# Altium PCB RADAR_D79_POWER_24V_v0.9.3.37_R10_3_37_REZONIT_IMPEDANCE_RECALC_NATIVE.PcbDoc (part 9 of 9)
Units mil, origin at the board's own origin, x right, y up, seen from the top; angles counter-clockwise.
Board outline 3110.24 x 3110.24 mil, 10 copper layers (Top Layer, RF_GND, SIG_A0, SIG_A1, PWR_A, PWR_B, SIG_B1, SIG_B0, DIGITAL_GND, Bottom Layer), stack 80.001 mil thick; 304 components, 269 nets, 1408 pads, 1372 vias.
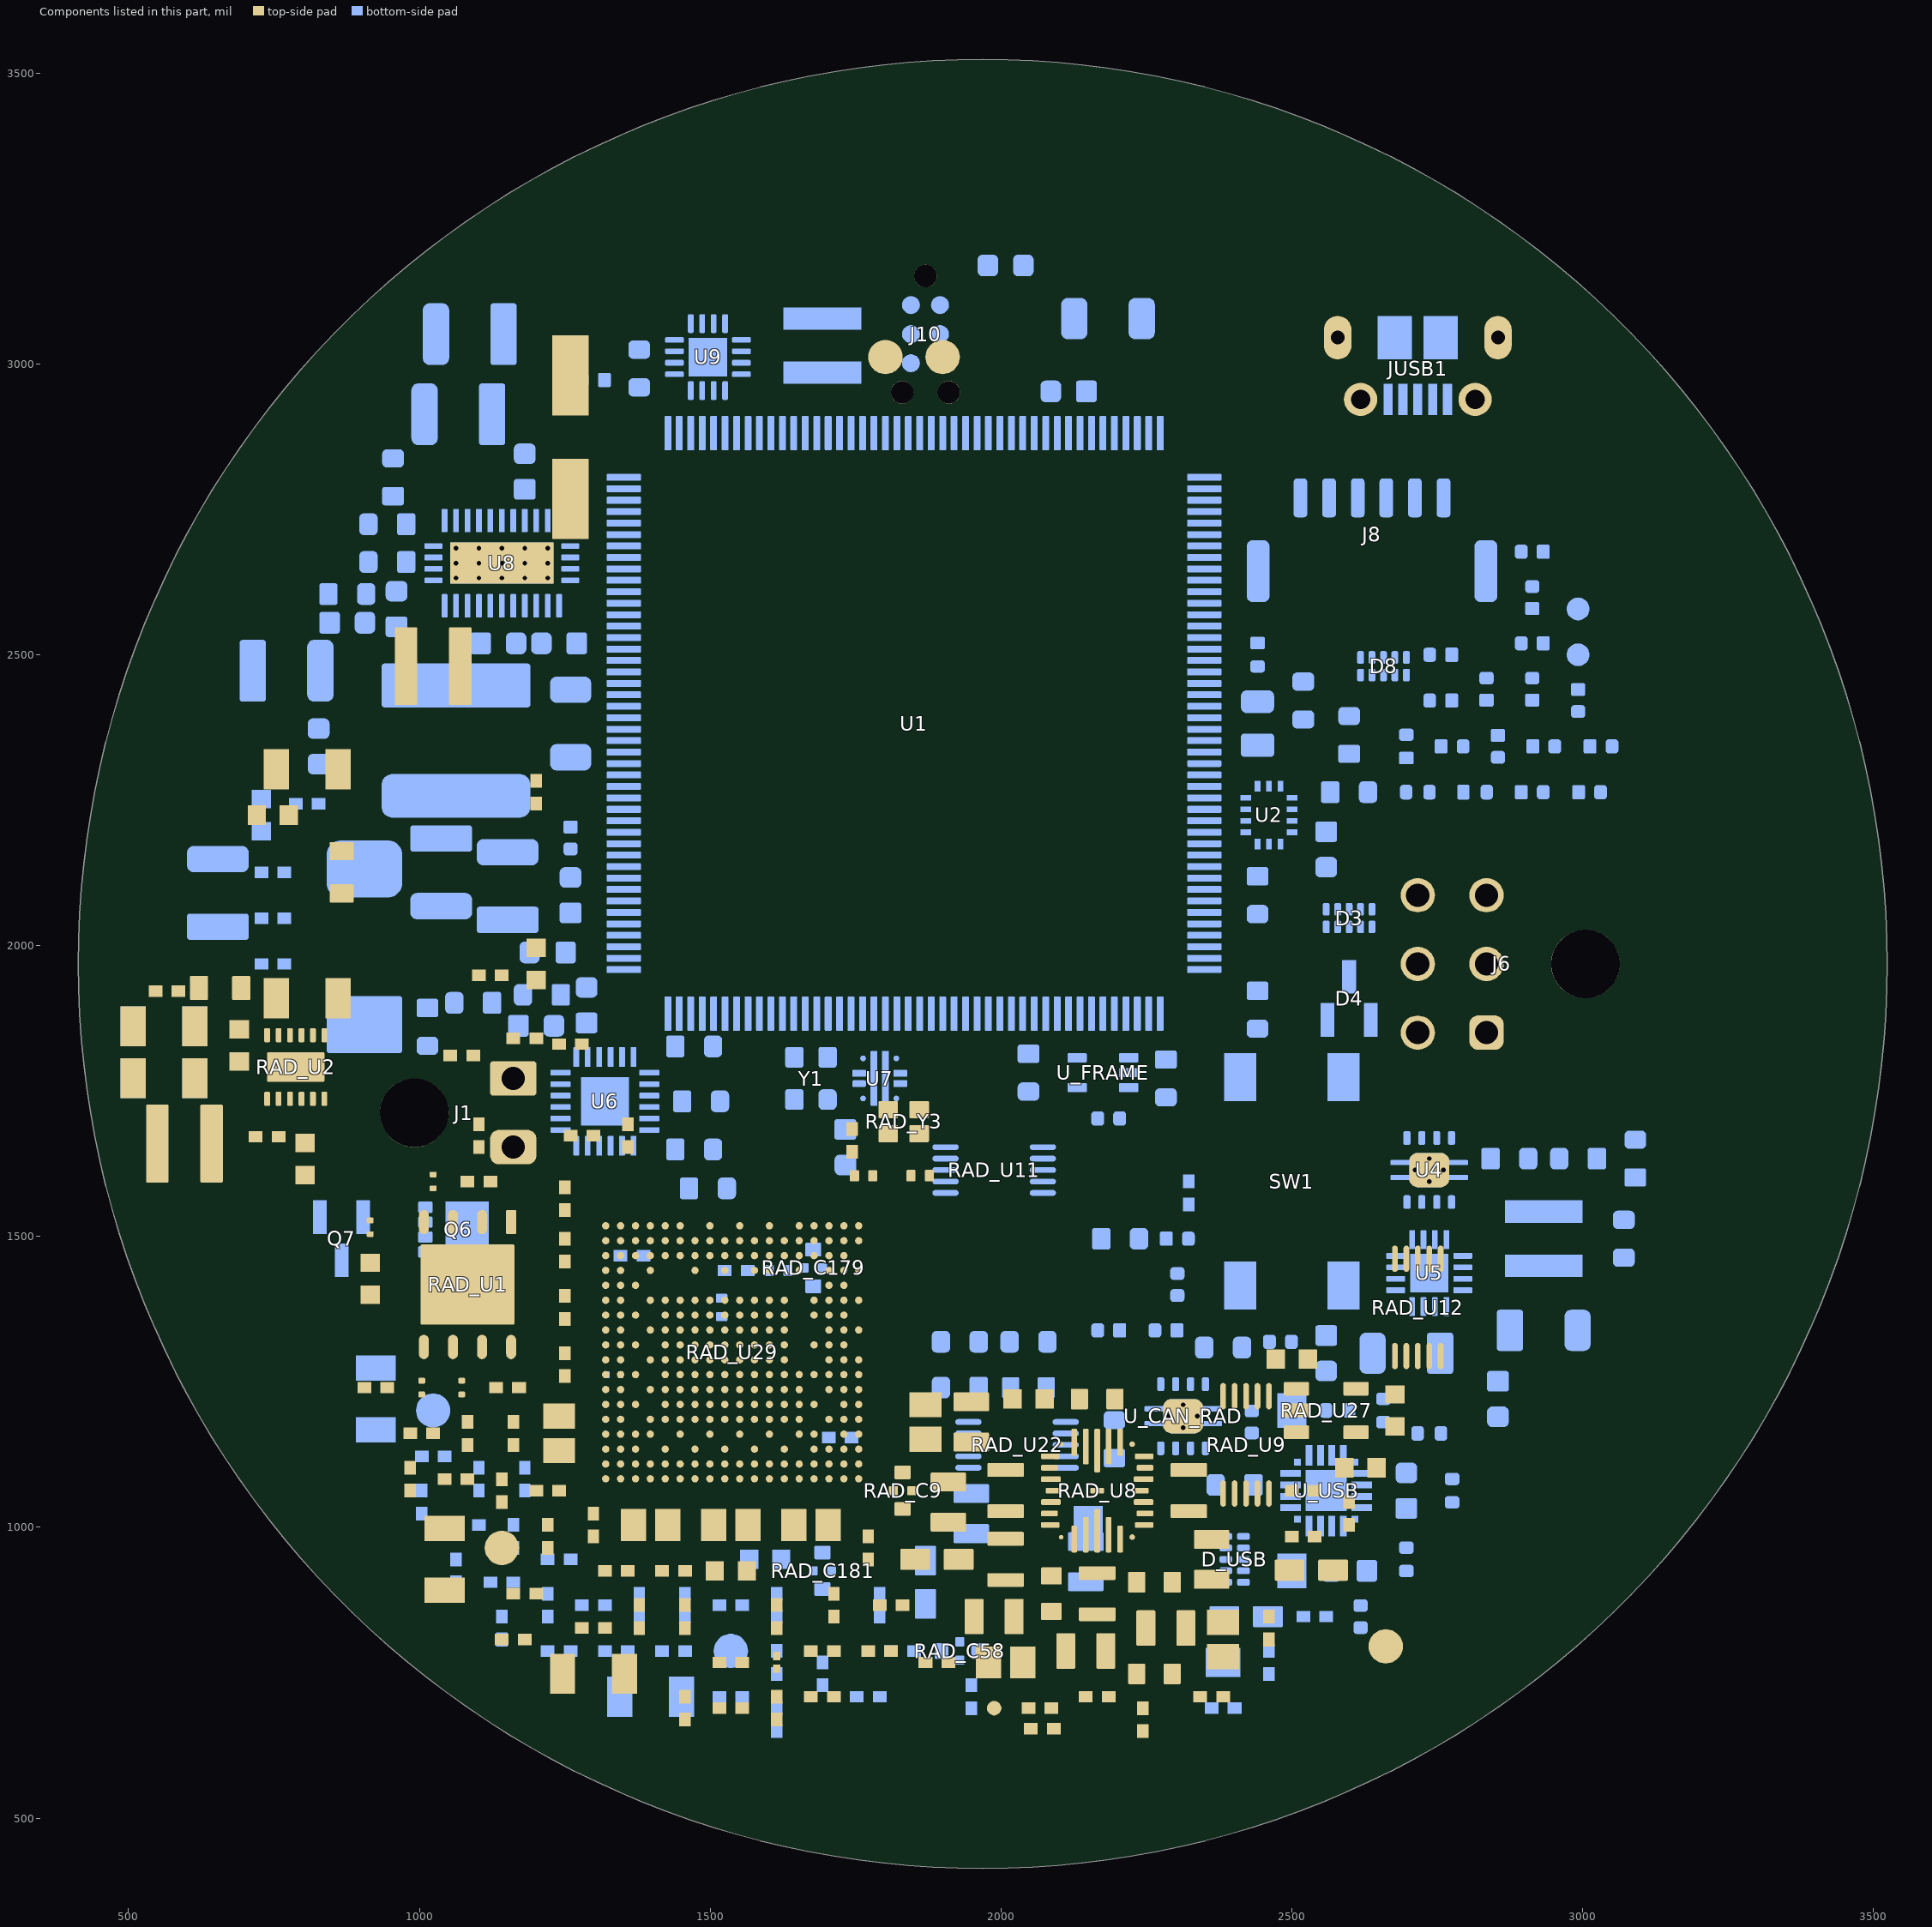
[diagram p17: the components of this part, seen from the top]

## Other copper
Top Layer:
  rectangle net TI_RX1: 1411.84,1961.62 1464.99,2004.14
  rectangle net TI_RX1: 1417.74,2021.76 1459.08,2064.28
  rectangle net TI_RX1: 1422.27,2081.9 1454.56,2124.42
  rectangle net TI_RX1: 1425.62,2142.04 1451.21,2184.56
  rectangle net TI_RX1: 1425.62,2202.18 1451.21,2244.7
  rectangle net TI_RX1: 1422.27,2262.33 1454.56,2304.85
  rectangle net TI_RX1: 1417.74,2322.47 1459.08,2364.99
  rectangle net TI_RX1: 1411.84,2382.61 1464.99,2425.13
  rectangle net TI_RX2: 1486.64,1961.62 1539.79,2004.14
  rectangle net TI_RX2: 1492.55,2021.76 1533.89,2064.28
  rectangle net TI_RX2: 1497.08,2081.9 1529.36,2124.42
  rectangle net TI_RX2: 1500.42,2142.04 1526.01,2184.56
  rectangle net TI_RX2: 1500.42,2202.18 1526.01,2244.7
  rectangle net TI_RX2: 1497.08,2262.33 1529.36,2304.85
  rectangle net TI_RX2: 1492.55,2322.47 1533.89,2364.99
  rectangle net TI_RX2: 1486.64,2382.61 1539.79,2425.13
  rectangle net TI_RX3: 1561.45,1961.62 1614.59,2004.14
  rectangle net TI_RX3: 1567.35,2021.76 1608.69,2064.28
  rectangle net TI_RX3: 1571.88,2081.9 1604.16,2124.42
  rectangle net TI_RX3: 1575.22,2142.04 1600.82,2184.56
  rectangle net TI_RX3: 1575.22,2202.18 1600.82,2244.7
  rectangle net TI_RX3: 1571.88,2262.33 1604.16,2304.85
  rectangle net TI_RX3: 1567.35,2322.47 1608.69,2364.99
  rectangle net TI_RX3: 1561.45,2382.61 1614.59,2425.13
  rectangle net TI_RX4: 1636.25,1961.62 1689.4,2004.14
  rectangle net TI_RX4: 1642.15,2021.76 1683.49,2064.28
  rectangle net TI_RX4: 1646.68,2081.9 1678.96,2124.42
  rectangle net TI_RX4: 1650.03,2142.04 1675.62,2184.56
  rectangle net TI_RX4: 1650.03,2202.18 1675.62,2244.7
  rectangle net TI_RX4: 1646.68,2262.33 1678.96,2304.85
  rectangle net TI_RX4: 1642.15,2322.47 1683.49,2364.99
  rectangle net TI_RX4: 1636.25,2382.61 1689.4,2425.13
  rectangle net TI_TX1: 1903.16,1968.57 1956.31,2011.08
  rectangle net TI_TX1: 1909.07,2028.71 1950.41,2071.23
  rectangle net TI_TX1: 1913.6,2088.85 1945.88,2131.37
  rectangle net TI_TX1: 1916.94,2148.99 1942.53,2191.51
  rectangle net TI_TX1: 1916.94,2209.13 1942.53,2251.65
  rectangle net TI_TX1: 1913.6,2269.27 1945.88,2311.79
  rectangle net TI_TX1: 1909.07,2329.42 1950.41,2371.94
  rectangle net TI_TX1: 1903.16,2389.56 1956.31,2432.08
  rectangle net TI_TX2: 2057.41,2091.99 2110.56,2134.51
  rectangle net TI_TX2: 2063.32,2152.13 2104.66,2194.65
  rectangle net TI_TX2: 2067.85,2212.27 2100.13,2254.79
  rectangle net TI_TX2: 2071.19,2272.42 2096.79,2314.94
  rectangle net TI_TX2: 2071.19,2332.56 2096.79,2375.08
  rectangle net TI_TX2: 2067.85,2392.7 2100.13,2435.22
  rectangle net TI_TX2: 2063.32,2452.84 2104.66,2495.36
  rectangle net TI_TX2: 2057.41,2512.98 2110.56,2555.5
  rectangle net TI_TX3: 2211.71,1968.57 2264.86,2011.08
  rectangle net TI_TX3: 2217.61,2028.71 2258.95,2071.23
  rectangle net TI_TX3: 2222.14,2088.85 2254.42,2131.37
  rectangle net TI_TX3: 2225.49,2148.99 2251.08,2191.51
  rectangle net TI_TX3: 2225.49,2209.13 2251.08,2251.65
  rectangle net TI_TX3: 2222.14,2269.27 2254.42,2311.79
  rectangle net TI_TX3: 2217.61,2329.42 2258.95,2371.94
  rectangle net TI_TX3: 2211.71,2389.56 2264.86,2432.08
  rectangle net TI_TX4: 2520.25,1968.57 2573.4,2011.08
  rectangle net TI_TX4: 2526.16,2028.71 2567.49,2071.23
  rectangle net TI_TX4: 2530.68,2088.85 2562.97,2131.37
  rectangle net TI_TX4: 2534.03,2148.99 2559.62,2191.51
  rectangle net TI_TX4: 2534.03,2209.13 2559.62,2251.65
  rectangle net TI_TX4: 2530.68,2269.27 2562.97,2311.79
  rectangle net TI_TX4: 2526.16,2329.42 2567.49,2371.94
  rectangle net TI_TX4: 2520.25,2389.56 2573.4,2432.08

## Silkscreen, mask and mechanical layers (free items; w line width, h text height)
M1 Board Outline:
  circle w3.94: c1968.5,1968.5 r1555.12
M2 Board Dimensions:
  lines w6.3: 1332.75,1735.72 1409.87,1735.72 1409.87,1623.56 1451.09,1582.35 1451.09,1537.98 1454.62,1534.44 1465.76,1534.44 1465.76,1507.74 1478.4,1507.74 1481.94,1511.28 1481.94,1534.44 1516.89,1534.44 1516.89,1507.74 1529.63,1507.74 1533.16,1511.28 1533.16,1534.44 1568.07,1534.44 1568.07,1507.74 1584.35,1507.74 1584.35,1534.44 1619.34,1534.44 1619.34,1507.74 1635.67,1507.74 1635.67,1535.6 1685.26,1585.19 1685.26,1629.06 1700.22,1644.02 1700.22,1813.89 1850.79,1813.89 1938.06,1726.62 1938.06,1565.78 1874.58,1502.3 1847.63,1502.3 1842.57,1497.24 1771.99,1497.24 1771.99,1475.16 1746.18,1475.16 1746.18,1458.97 1771.99,1458.97 1771.99,1424.03 1746.18,1424.03 1746.18,1407.79 1771.99,1407.79 1771.99,1372.89 1746.18,1372.89 1746.18,1360.15 1749.72,1356.61 1771.99,1356.61 1771.99,1321.71 1746.18,1321.71 1746.18,1305.43 1771.99,1305.43 1771.99,1287.99 2635.41,1287.99 2635.41,2872.45 1332.75,2872.45 1332.75,1735.72
  text "RF WINDOW REF" at 1456.69,1732.28 h41.34
M3 3D STEP Top:
  lines w6.3: 1222.86,985.81 1852.78,985.81 1852.78,1615.74 1222.86,1615.74 1222.86,985.81 ; 2472.44,944.88 2755.91,944.88 2755.91,1181.1 2472.44,1181.1 2472.44,944.88
  text "REAR HEAT RESERVE" at 1259.84,1181.1 h41.34
  text "USB BRIDGE RESERVE" at 2322.83,1141.73 h41.34